# Altium PCB MiniPC.PcbDoc (part 2 of 24)
Units mm, origin at the board's own origin, x right, y up, seen from the top; angles counter-clockwise.
Board outline 175 x 155 mm, 16 copper layers (1_Top, 2_int1_(gnd), 3_int2_(power), 4_int3_(gnd), 5_int4_(sign), 6_int5_(power), 7_int6_(sign), 8_int7_(power), 9_int8_(gnd), 10_int9_(sign), 11_int10_(gnd), 12_int11_(sign), 13_int12_(gnd), 14_int13_(power), 15_int14_(gnd), 16_Bottom), stack 2.008 mm thick; 1046 components, 837 nets, 6010 pads, 4009 vias.
Unrouted connection lines stored in the file: 564.
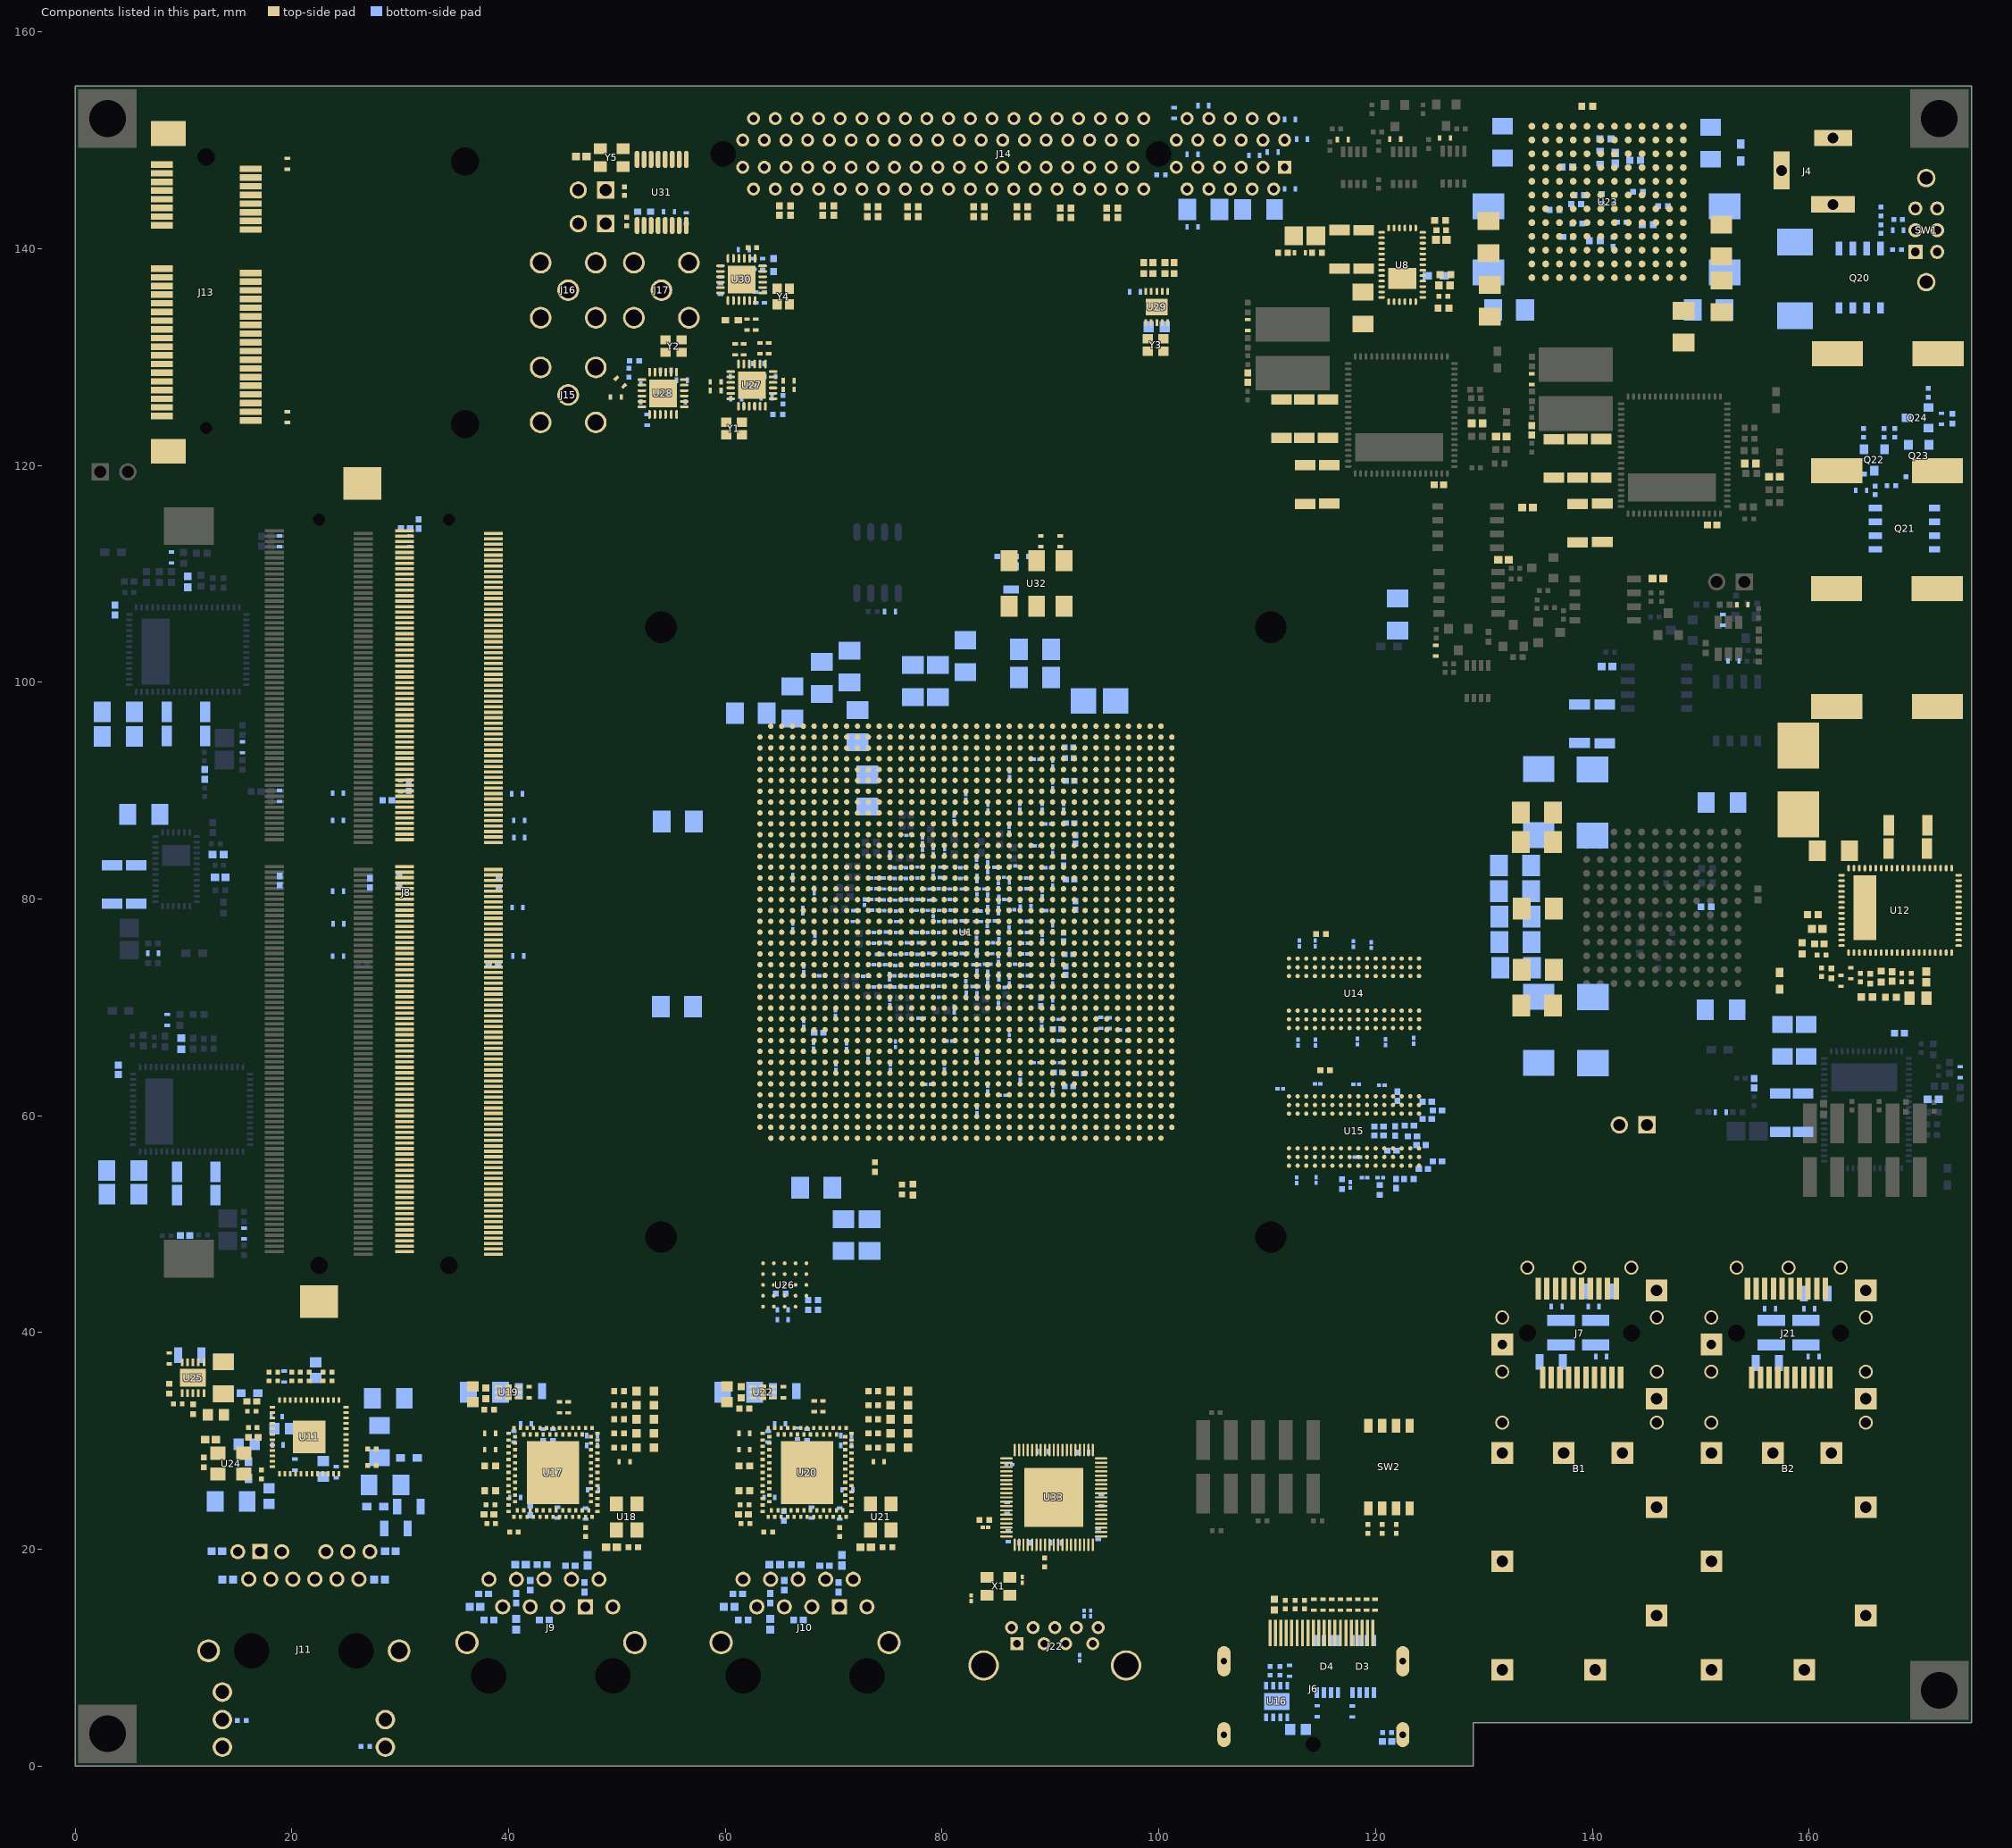
[diagram p16: the components of this part, seen from the top]

## Classes and differential pairs (continued)
component class 3V3_to_2V5: C60 C61 C62 C63 C64 C65 L7 R104 R105 R106 R107 R108 R109 R110 R111 U8
component class 12V_to_3V3: C95 C96 C97 C98 C99 C100 C101 C102 C103 C104 C105 C106 C107 L9 R155 R156 R157 R158 R159 R160 R161 R162 R163 R164 R165 R166 R167 R168 R169 R170 R171 U23
component class 12V_to_5V: C108 C109 C110 C111 C112 C113 C114 C115 C116 C117 F1 L10 R172 R173 R174 R175 R176 R177 R178 R179 R180 R181 R182 R183 U12
component class 12V_POWER: C73 C74 C75 C76 C77 C78 C79 D1 J4 J5 Q20 Q21 Q22 Q23 Q24 R128 R129 R130 R131 R132 R133 R134 R135 R136 R137 R138 R139 R140 SW1
component class U_PLL1: C510 C511 C512 C513 C514 C515 C516 C517 C518 C519 C520 C521 C522 C523 C524 C525 C526 C527 C528 C529 C530 C531 J15 J16 L17 L18 R333 R334 U27 U28 Y1 Y2
component class U_PLL: C532 C533 C534 C535 C536 C537 C538 C539 C540 C541 C542 C543 C544 C545 C546 C547 C548 C549 J17 J18 J19 L19 L20 L21 L22 R335 R336 R337 R338 R339 R340 R341 U29 U30 U31 U32 Y3 Y4 Y5
component class U_USB3: U1
component class U_USB3: C560 C561 C562 C563 C564 C565 C566 C567 C568 C569 C570 C571 C572 C573 C574 J22 R342 R343 U33 X1
component class U_DDR4: C264 C265 C266 C267 C268 C269 C270 C271 C272 C273 C274 C275 C276 C277 C278 C279 C280 C281 C282 R208 R209 R210 R211 R212 R213 R214 R215 R216 R217 R218 R219 R220 R221 R222 R223 R224 R225 R226 U14 U15
component class U_DDR4_SODIMM1: C283 C284 C285 C286 C287 C288 C289 J8 R227 R228 R229 R230 R231
component class U_DDR4_SODIMM_Arria10: R237 R238 R239 R240 R241
component class U_Ethernet-HPS: C362 C363 C364 C365 C366 C367 C368 C369 C370 C371 C372 C373 C374 C375 C376 C377 C378 C379 C380 C381 C382 C383 C384 C385 C386 C387 J11 L11 L12 L13 L14 R297 R298 R299 R300 R301 R302 R303 R304 R305 R306 R307 R308 R309 R310 R311 R312 R313 R314 R315 R316 U11 U24 U25
component class U_HPS1_Arria10: C388 C389 R317 R318 R319 R320 R321 R322 R323 R324 R325 SW2 U26
component class U_Display_Port: C297 C298 C299 C300 C301 C302 C303 C304 C305 C306 C307 C308 C309 D3 D4 J6 R242 R243 R244 R245 R246 R247 R248 U16
component class U_SFP_PortB: B2 C555 C556 C557 C558 C559 J21 L25 L26
component class U_SFP_PortA: B1 C550 C551 C552 C553 C554 J7 L23 L24
component class U_Ethernet2: C336 C337 C338 C339 C340 C341 C342 C343 C344 C345 C346 C347 C348 C349 C350 C351 C352 C353 C354 C355 C356 C357 C358 C359 C360 C361 D10 D11 D12 D13 D14 J10 R273 R274 R275 R276 R277 R278 R279 R280 R281 R282 R283 R284 R285 R286 R287 R288 R289 R290 R291 R292 R293 R294 R295 R296 U20 U21 U22
component class U_Ethernet1: C310 C311 C312 C313 C314 C315 C316 C317 C318 C319 C320 C321 C322 C323 C324 C325 C326 C327 C328 C329 C330 C331 C332 C333 C334 C335 D5 D6 D7 D8 D9 J9 R249 R250 R251 R252 R253 R254 R255 R256 R257 R258 R259 R260 R261 R262 R263 R264 R265 R266 R267 R268 R269 R270 R271 R272 U17 U18 U19
component class U_PCIE_Connector: C483 C484 C485 C486 C487 C488 C489 C490 C491 C492 C493 C494 C495 C496 C497 C498 C499 C500 C501 C502 C503 C504 C505 C506 C507 C508 C509 J14 R332
component class U_miniPCIE_Connector: C481 C482 J13
differential pair class DDR4_80: DDR4_CLK DDR4_DQS0 DDR4_DQS1 DDR4_DQS2 DDR4_DQS3 DDR4_SODIMM_CK0 DDR4_SODIMM_CK1 DDR4_SODIMM_CK2 DDR4_SODIMM_CK3 DDR4_SODIMM_DQS0 DDR4_SODIMM_DQS1 DDR4_SODIMM_DQS2 DDR4_SODIMM_DQS3 DDR4_SODIMM_DQS4 DDR4_SODIMM_DQS5 DDR4_SODIMM_DQS6 DDR4_SODIMM_DQS7
net class USB3: USB3_BE0 USB3_BE1 USB3_BE2 USB3_BE3 USB3_CLK USB3_D0 USB3_D1 USB3_D2 USB3_D3 USB3_D4 USB3_D5 USB3_D6 USB3_D7 USB3_D8 USB3_D9 USB3_D10 USB3_D11 USB3_D12 USB3_D13 USB3_D14 USB3_D15 USB3_D16 USB3_D17 USB3_D18 USB3_D19 USB3_D20 USB3_D21 USB3_D22 USB3_D23 USB3_D24 USB3_D25 USB3_D26 USB3_D27 USB3_D28 USB3_D29 USB3_D30 USB3_D31 USB3_OE USB3_RD USB3_RESERVED USB3_RXF USB3_SIWU USB3_TXE USB3_WAKEUP USB3_WR
net class PCIE_TX: PCIE_TX0_N PCIE_TX0_P PCIE_TX1_N PCIE_TX1_P PCIE_TX2_N PCIE_TX2_P PCIE_TX3_N PCIE_TX3_P PCIE_TX4_N PCIE_TX4_P PCIE_TX5_N PCIE_TX5_P PCIE_TX6_N PCIE_TX6_P PCIE_TX7_N PCIE_TX7_P
net class PCIE_TX_C: PCIE_TX0_C_N PCIE_TX0_C_P PCIE_TX1_C_N PCIE_TX1_C_P PCIE_TX2_C_N PCIE_TX2_C_P PCIE_TX3_C_N PCIE_TX3_C_P PCIE_TX4_C_N PCIE_TX4_C_P PCIE_TX5_C_N PCIE_TX5_C_P PCIE_TX6_C_N PCIE_TX6_C_P PCIE_TX7_C_N PCIE_TX7_C_P
net class PCIE_RX: PCIE_RX0_N PCIE_RX0_P PCIE_RX1_N PCIE_RX1_P PCIE_RX2_N PCIE_RX2_P PCIE_RX3_N PCIE_RX3_P PCIE_RX4_N PCIE_RX4_P PCIE_RX5_N PCIE_RX5_P PCIE_RX6_N PCIE_RX6_P PCIE_RX7_N PCIE_RX7_P
differential pair class SFPA_TX: SFPA_TX
differential pair class SFPA_RX: SFPA_RX
differential pair class SFPB_RX: SFPB_RX
differential pair class SFPB_TX: SFPB_TX
differential pair class PCIE_85: CLK_DIFF1 CLK_DIFF2 MINI_PCIE_PER MINI_PCIE_USB_D MINIPCIE_PET MINIPCIE_REFCLK PCIE_REFCLK_QR0 PCIE_REFCLK_SYN PCIE_RX0 PCIE_RX1 PCIE_RX2 PCIE_RX3 PCIE_RX4 PCIE_RX5 PCIE_RX6 PCIE_RX7 PCIE_TX0 PCIE_TX0_C PCIE_TX1 PCIE_TX1_C PCIE_TX2 PCIE_TX2_C PCIE_TX3 PCIE_TX3_C PCIE_TX4 PCIE_TX4_C PCIE_TX5 PCIE_TX5_C PCIE_TX6 PCIE_TX6_C PCIE_TX7 PCIE_TX7_C
net class PCIE_Upr: MINI_PCIE_SMB_CLK MINI_PCIE_SMB_DATA MINIPCIE_CLKREQ_L MINIPCIE_LED_WLAN_L MINIPCIE_PERST_L MINIPCIE_W_DISABLE_L MINIPCIE_WAKE_L PCIE_PERSTN
net class USB3_diff: USB3_D_N USB3_D_P USB3_SSRX_N USB3_SSRX_P USB3_TOD_N USB3_TOD_P
pad class Class_Polygon: C9-1 C10-1 C11-1 C12-1 C18-1 C19-1 C20-1 C21-1 C22-1 C28-1 C29-1 C30-1 C31-1 C37-1 C38-1 C39-1 C40-1 C45-1 C46-1 C47-1 C51-1 C52-1 C53-1 C55-1 C56-1 C61-1 C62-1 C63-1 C71-1 C72-1 C74-2 C75-2 C76-2 C77-2 C80-2 C81-1 C81-2 C82-1 C83-1 C84-1 C85-1 C85-2 C86-1 C87-2 C88-1 C88-2 C89-1 C90-1 C91-1 C92-1 C93-1 C95-2 C96-1 C97-1 C98-1 C99-1 C100-1 C101-2 C102-1 C103-1 C104-1 C105-1 C112-1 C113-1 C116-1 C132-1 C135-1 C206-2 C207-2 C208-2 C209-2 C222-2 C224-1 C225-1 C226-1 C227-1 C228-2 C231-1 C232-1 C236-1 C237-1 C238-1 C243-1 C244-1 C245-1 C246-1 C247-1 C256-1 C257-1 C258-2 C259-2 C260-1 C265-2 C266-2 C267-1 C282-1 C283-1 C284-1 C290-1 C291-1 C292-1 C293-1 C294-1 C309-1 C310-1 C311-1 C312-1 C327-1 C329-1 C495-2 D1-2 J4-1 J4-2 J4-3 L3-1 L5-1 L6-1 L8-1 Q20-1 Q20-2 Q20-3 U11-49 U33-69
net class SFP: SFPA_RX_N SFPA_RX_P SFPA_TX_N SFPA_TX_P SFPB_RX_N SFPB_RX_P SFPB_TX_N SFPB_TX_P
net class PCIE_CLK: PCIE_REFCLK_QR0_N PCIE_REFCLK_QR0_P PCIE_REFCLK_SYN_N PCIE_REFCLK_SYN_P
differential pair MINI_PCIE_USB_D: +MINI_PCIE_USB_D_P -MINI_PCIE_USB_D_N
differential pair USB3_SSRX: +USB3_SSRX_P -USB3_SSRX_N
differential pair USB3_TOD: +USB3_TOD_P -USB3_TOD_N
differential pair USB3_SSTX: +USB3_SSTX_P -USB3_SSTX_N
differential pair USB3_D: +USB3_D_P -USB3_D_N
differential pair TRD4: +TRD4_P -TRD4_N
differential pair TRD3: +TRD3_P -TRD3_N
differential pair TRD2: +TRD2_P -TRD2_N
differential pair TRD1: +TRD1_P -TRD1_N
differential pair REFCLK_SMA: +REFCLK_SMA_P -REFCLK_SMA_N
differential pair REFCLK_SDI: +REFCLK_SDI_P -REFCLK_SDI_N
differential pair REFCLK_DP: +REFCLK_DP_P -REFCLK_DP_N
differential pair REFCLK1_FMCB: +REFCLK1_FMCB_P -REFCLK1_FMCB_N
differential pair PCIE_TX7: +PCIE_TX7_P -PCIE_TX7_N
differential pair PCIE_TX7_C: +PCIE_TX7_C_P -PCIE_TX7_C_N
differential pair PCIE_TX6: +PCIE_TX6_P -PCIE_TX6_N
differential pair PCIE_TX6_C: +PCIE_TX6_C_P -PCIE_TX6_C_N
differential pair PCIE_TX5: +PCIE_TX5_P -PCIE_TX5_N
differential pair PCIE_TX5_C: +PCIE_TX5_C_P -PCIE_TX5_C_N
differential pair PCIE_TX4: +PCIE_TX4_P -PCIE_TX4_N
differential pair PCIE_TX4_C: +PCIE_TX4_C_P -PCIE_TX4_C_N
differential pair PCIE_TX3: +PCIE_TX3_P -PCIE_TX3_N
differential pair PCIE_TX3_C: +PCIE_TX3_C_P -PCIE_TX3_C_N
differential pair PCIE_TX2: +PCIE_TX2_P -PCIE_TX2_N
differential pair PCIE_TX2_C: +PCIE_TX2_C_P -PCIE_TX2_C_N
differential pair PCIE_TX1: +PCIE_TX1_P -PCIE_TX1_N
differential pair PCIE_TX1_C: +PCIE_TX1_C_P -PCIE_TX1_C_N
differential pair PCIE_TX0: +PCIE_TX0_P -PCIE_TX0_N
differential pair PCIE_TX0_C: +PCIE_TX0_C_P -PCIE_TX0_C_N
differential pair PCIE_RX7: +PCIE_RX7_P -PCIE_RX7_N
differential pair PCIE_RX6: +PCIE_RX6_P -PCIE_RX6_N
differential pair PCIE_RX5: +PCIE_RX5_P -PCIE_RX5_N
differential pair PCIE_RX4: +PCIE_RX4_P -PCIE_RX4_N
differential pair PCIE_RX3: +PCIE_RX3_P -PCIE_RX3_N
differential pair PCIE_RX2: +PCIE_RX2_P -PCIE_RX2_N
differential pair PCIE_RX1: +PCIE_RX1_P -PCIE_RX1_N
differential pair PCIE_RX0: +PCIE_RX0_P -PCIE_RX0_N
differential pair PCIE_REFCLK_SYN: +PCIE_REFCLK_SYN_P -PCIE_REFCLK_SYN_N
differential pair PCIE_REFCLK_QR0: +PCIE_REFCLK_QR0_P -PCIE_REFCLK_QR0_N
differential pair ENETB_TX: +ENETB_TX_P -ENETB_TX_N
differential pair ENETB_TXC: +ENETB_TXC_P -ENETB_TXC_N
differential pair ENETB_RX: +ENETB_RX_P -ENETB_RX_N
differential pair ENETB_RXC: +ENETB_RXC_P -ENETB_RXC_N
differential pair ENETA_TX: +ENETA_TX_P -ENETA_TX_N
differential pair ENETA_TXC: +ENETA_TXC_P -ENETA_TXC_N
differential pair ENETA_RX: +ENETA_RX_P -ENETA_RX_N
differential pair ENETA_RXC: +ENETA_RXC_P -ENETA_RXC_N
differential pair DP_ML_LANE3: +DP_ML_LANE3_P -DP_ML_LANE3_N
differential pair DP_ML_LANE3_C: +DP_ML_LANE3_C_P -DP_ML_LANE3_C_N
differential pair DP_ML_LANE2: +DP_ML_LANE2_P -DP_ML_LANE2_N
differential pair DP_ML_LANE2_C: +DP_ML_LANE2_C_P -DP_ML_LANE2_C_N
differential pair DP_ML_LANE1: +DP_ML_LANE1_P -DP_ML_LANE1_N
differential pair DP_ML_LANE1_C: +DP_ML_LANE1_C_P -DP_ML_LANE1_C_N
differential pair DP_ML_LANE0: +DP_ML_LANE0_P -DP_ML_LANE0_N
differential pair DP_ML_LANE0_C: +DP_ML_LANE0_C_P -DP_ML_LANE0_C_N
differential pair DDR4_DQS3: +DDR4_DQS3_P -DDR4_DQS3_N
differential pair DDR4_DQS2: +DDR4_DQS2_P -DDR4_DQS2_N
differential pair DDR4_DQS1: +DDR4_DQS1_P -DDR4_DQS1_N
differential pair DDR4_DQS0: +DDR4_DQS0_P -DDR4_DQS0_N
differential pair DDR4_CLK: +DDR4_CLK_P -DDR4_CLK_N
differential pair CLK_ENET_FPGA: +CLK_ENET_FPGA_P -CLK_ENET_FPGA_N
differential pair BMDI3: +BMDI3_P -BMDI3_N
differential pair BMDI2: +BMDI2_P -BMDI2_N
differential pair BMDI1: +BMDI1_P -BMDI1_N
differential pair BMDI0: +BMDI0_P -BMDI0_N
differential pair AMDI3: +AMDI3_P -AMDI3_N
differential pair AMDI2: +AMDI2_P -AMDI2_N
differential pair AMDI1: +AMDI1_P -AMDI1_N
differential pair AMDI0: +AMDI0_P -AMDI0_N
differential pair REFCLK0_FMCB: +REFCLK0_FMCB_P -REFCLK0_FMCB_N
differential pair SFPA_RX: +SFPA_RX_P -SFPA_RX_N
differential pair SFPA_TX: +SFPA_TX_P -SFPA_TX_N
differential pair SFPB_RX: +SFPB_RX_P -SFPB_RX_N
differential pair SFPB_TX: +SFPB_TX_P -SFPB_TX_N
differential pair DDR4_SODIMM_CK0: +DDR4_SODIMM_CK0_P -DDR4_SODIMM_CK0_N
differential pair DDR4_SODIMM_CK1: +DDR4_SODIMM_CK1_P -DDR4_SODIMM_CK1_N
differential pair DDR4_SODIMM_DQS0: +DDR4_SODIMM_DQS0_P -DDR4_SODIMM_DQS0_N
differential pair DDR4_SODIMM_DQS1: +DDR4_SODIMM_DQS1_P -DDR4_SODIMM_DQS1_N
differential pair DDR4_SODIMM_DQS2: +DDR4_SODIMM_DQS2_P -DDR4_SODIMM_DQS2_N
differential pair DDR4_SODIMM_DQS3: +DDR4_SODIMM_DQS3_P -DDR4_SODIMM_DQS3_N
differential pair DDR4_SODIMM_DQS4: +DDR4_SODIMM_DQS4_P -DDR4_SODIMM_DQS4_N
differential pair DDR4_SODIMM_DQS5: +DDR4_SODIMM_DQS5_P -DDR4_SODIMM_DQS5_N
differential pair DDR4_SODIMM_DQS6: +DDR4_SODIMM_DQS6_P -DDR4_SODIMM_DQS6_N
differential pair DDR4_SODIMM_DQS7: +DDR4_SODIMM_DQS7_P -DDR4_SODIMM_DQS7_N
differential pair DDR4_SODIMM_CK2: +DDR4_SODIMM_CK2_P -DDR4_SODIMM_CK2_N
differential pair DDR4_SODIMM_CK3: +DDR4_SODIMM_CK3_P -DDR4_SODIMM_CK3_N
differential pair CLK_DIFF1: +CLK_DIFF1_P -CLK_DIFF1_N
differential pair CLK_DIFF2: +CLK_DIFF2_P -CLK_DIFF2_N
differential pair ENET_REFCLK_C: +ENET_REFCLK_C_P -ENET_REFCLK_C_N
differential pair REFCLK0_FMCB_C: +REFCLK0_FMCB_C_P -REFCLK0_FMCB_C_N
differential pair REFCLK1_FMCB_C: +REFCLK1_FMCB_C_P -REFCLK1_FMCB_C_N
differential pair REFCLK_DP_C: +REFCLK_DP_C_P -REFCLK_DP_C_N
differential pair MINI_PCIE_PER: +MINI_PCIE_PER_P -MINI_PCIE_PER_N
differential pair MINIPCIE_PET: +MINIPCIE_PET_P -MINIPCIE_PET_N
differential pair MINIPCIE_REFCLK: +MINIPCIE_REFCLK_P -MINIPCIE_REFCLK_N
differential pair A10_HLVDDI: +A10_HLVDDI_P -A10_HLVDDI_N

## Components (designator, comment, footprint, x,y, rotation, side; value= is the part's Value field where it differs from the comment)
B1 "74754-0101" MOLX-74754-0101_V 138.8,27.45 r180 top locked
B2 "74754-0101" MOLX-74754-0101_V 158.1,27.45 r180 top locked
C1 "CGB2A1X5R1E105K033BC" CAPC1005X33X10LL5 125.55,102.91 r90 top
C2 "GRM155R71H103KA88D" CAPC1005X55X25ML05T10 134.01,116.1 r180 top
C3 "GRM155R71H103KA88D" CAPC1005X55X25ML05T10 131.8,111.3 r180 top
C4 "CGB2A1X5R1E105K033BC" CAPC1005X33X10LL5 121.8,150.1 r0 top
C5 "CGB2A1X5R1E105K033BC" CAPC1005X33X10LL5 126.4,150.2 r0 top
C6 "CGB2A1X5R1E105K033BC" CAPC1005X33X10LL5 116.97,150.05 r0 top
C7 "CGB2A1X5R1E105K033BC" CAPC1005X33X10LL5 15.45,93.99 r90 bottom
C8 "C1005C0G1H220J050BA" CAPC1005X55X10LL05 8.9,111.5 r270 bottom locked
C9 "GRM31CR61E226KE15L" CAPC3216X180X55ML20T25 3.99,97.28 r180 bottom
C10 "GRM31CR61E226KE15L" CAPC3216X180X55ML20T25 3.99,94.99 r180 bottom
C11 "C3216X5R1A476M160AB" CAPC3216X180X20ML20 10.22,95.03 r0 bottom
C12 "C3216X5R1A476M160AB" CAPC3216X180X20ML20 10.25,97.28 r0 bottom
C13 "GRM155R61A224KE19D" CAPC1005X55X25NL05T10 11.95,91.49 r270 bottom
C14 "VJ0402Y153JXQPW1BC" CAPC1005X55X23ML05T8 10.4,109.26 r270 bottom locked
C15 "GRM155R61A224KE19D" CAPC1005X55X25NL05T10 3.7,106.66 r270 bottom locked
C16 "GRM155R61A224KE19D" CAPC1005X55X25NL05T10 108.19,128.11 r270 top
C17 "ECJ-0EC1H270J" CAPC1005X55X20ML5T10 131.59,122.67 r0 top
C18 "C3216X5R1A476M160AB" CAPC3216X180X20ML20 113.51,118.23 r270 top
C19 "C3216X5R1A476M160AB" CAPC3216X180X20ML20 115.73,118.25 r270 top
C20 "C3216X5R1A476M160AB" CAPC3216X180X20ML20 111.3,124.315 r90 top
C21 "C3216X5R1A476M160AB" CAPC3216X180X20ML20 115.61,124.31 r90 top
C22 "C3216X5R1A476M160AB" CAPC3216X180X20ML20 113.43,124.32 r90 top
C23 "CGB2A1X5R1E105K033BC" CAPC1005X33X10LL5 108.21,132.95 r90 top
C24 "VJ0402Y153JXQPW1BC" CAPC1005X55X23ML05T8 129.365,123.87 r180 top
C25 "GRM155R61A224KE19D" CAPC1005X55X25NL05T10 125.84,118.21 r180 top
C26 "CGB2A1X5R1E105K033BC" CAPC1005X33X10LL5 15.6,49.15 r90 bottom
C27 "C1005C0G1H220J050BA" CAPC1005X55X10LL05 8.495,68.85 r270 bottom locked
C28 "GRM31CR61E226KE15L" CAPC3216X180X55ML20T25 4.41,54.97 r180 bottom
C29 "GRM31CR61E226KE15L" CAPC3216X180X55ML20T25 4.42,52.77 r180 bottom
C30 "C3216X5R1A476M160AB" CAPC3216X180X20ML20 11.185,54.83 r0 bottom
C31 "C3216X5R1A476M160AB" CAPC3216X180X20ML20 11.17,52.69 r0 bottom
C32 "GRM155R61A224KE19D" CAPC1005X55X25NL05T10 10.15,48.95 r180 bottom
C33 "VJ0402Y153JXQPW1BC" CAPC1005X55X23ML05T8 9.795,66.65 r270 bottom locked
C34 "GRM155R61A224KE19D" CAPC1005X55X25NL05T10 3.995,64.25 r270 bottom locked
C35 "CGB2A1X5R1E105K033BC" CAPC1005X33X10LL5 151.83,60.34 r0 bottom
C36 "C1005C0G1H220J050BA" CAPC1005X55X10LL05 173.935,64.03 r90 bottom locked
C37 "GRM31CR61E226KE15L" CAPC3216X180X55ML20T25 157.52,66.95 r90 bottom
C38 "GRM31CR61E226KE15L" CAPC3216X180X55ML20T25 159.71,66.96 r90 bottom
C39 "C3216X5R1A476M160AB" CAPC3216X180X20ML20 157.32,60.28 r270 bottom
C40 "C3216X5R1A476M160AB" CAPC3216X180X20ML20 159.44,60.29 r270 bottom
C41 "GRM155R61A224KE19D" CAPC1005X55X25NL05T10 154.91,63 r90 bottom
C42 "VJ0402Y153JXQPW1BC" CAPC1005X55X23ML05T8 171.435,61.53 r180 bottom locked
C43 "GRM155R61A224KE19D" CAPC1005X55X25NL05T10 168.335,67.63 r180 bottom locked
C44 "CGB2A1X5R1E105K033BC" CAPC1005X33X10LL5 7.2,75 r0 bottom locked
C45 "GRM31CR61E226KE15L" CAPC3216X180X55ML20T25 6.34,87.81 r0 bottom
C46 "C3216X5R1A476M160AB" CAPC3216X180X20ML20 3.43,81.355 r270 bottom
C47 "C3216X5R1A476M160AB" CAPC3216X180X20ML20 5.64,81.335 r270 bottom
C48 "ECJ-0EC1H150J" CAPC1005X55X20ML5T10 13.4,82 r0 bottom locked
C49 "VJ0402Y153JXQPW1BC" CAPC1005X55X23ML05T8 13.2,84.1 r180 bottom locked
C50 "GRM155R61A224KE19D" CAPC1005X55X25NL05T10 134.41,123.25 r270 top
C51 "ECJ-0EC1H270J" CAPC1005X55X20ML5T10 156.795,118.96 r0 top
C52 "C3216X5R1A476M160AB" CAPC3216X180X20ML20 140.91,114.7 r270 top
C53 "C3216X5R1A476M160AB" CAPC3216X180X20ML20 138.64,114.67 r270 top
C54 "C3216X5R1A476M160AB" CAPC3216X180X20ML20 138.62,120.66 r90 top
C55 "C3216X5R1A476M160AB" CAPC3216X180X20ML20 140.82,120.66 r90 top
C56 "C3216X5R1A476M160AB" CAPC3216X180X20ML20 136.43,120.63 r90 top
C57 "CGB2A1X5R1E105K033BC" CAPC1005X33X10LL5 134.41,127.96 r90 top
C58 "VJ0402Y153JXQPW1BC" CAPC1005X55X23ML05T8 154.57,120.16 r180 top
C59 "GRM155R61A224KE19D" CAPC1005X55X25NL05T10 151.045,114.5 r180 top
C60 "CGB2A1X5R1E105K033BC" CAPC1005X33X10LL5 113.02,139.62 r180 top
C61 "GRM31CR61E226KE15L" CAPC3216X180X55ML20T25 118.83,134.52 r270 top
C62 "C3216X5R1A476M160AB" CAPC3216X180X20ML20 118.88,139.93 r90 top
C63 "C3216X5R1A476M160AB" CAPC3216X180X20ML20 116.67,139.94 r90 top
C64 "ECJ-0EC1H150J" CAPC1005X55X20ML5T10 126.05,140.8 r0 top
C65 "VJ0402Y153JXQPW1BC" CAPC1005X55X23ML05T8 126.35,136.6 r180 top
C66 "CGB2A1X5R1E105K033BC" CAPC1005X33X10LL5 153.02,101.96 r180 bottom
C67 "GRM155R71H103KA88D" CAPC1005X55X25ML05T10 146.045,109.55 r180 top
C68 "C1005X7R1E104M" CAPC1005X55X10LL05 152.045,105.75 r90 bottom locked
C69 "C1005X7R1E104M" CAPC1005X55X10LL05 153.845,107.15 r180 top
C70 "GRM155R71H103KA88D" CAPC1005X55X25ML05T10 141.345,101.45 r0 bottom locked
C71 "C3216X5R1A476M160AB" CAPC3216X180X20ML20 141.145,96.15 r90 bottom locked
C72 "C3216X5R1A476M160AB" CAPC3216X180X20ML20 138.81,96.16 r90 bottom
C73 "CGB2A1X5R1E105K033BC" CAPC1005X33X10LL5 168.2,141.7 r180 bottom locked
C74 "EEH-ZA1E331P" PNSC-EEH-ZA1E331P_M 167.19,119.5 r0 top
C75 "EEH-ZA1E331P" PNSC-EEH-ZA1E331P_M 167.19,97.76 r0 top
C76 "EEH-ZA1E331P" PNSC-EEH-ZA1E331P_M 167.16,108.62 r0 top
C77 "EEH-ZA1E331P" PNSC-EEH-ZA1E331P_M 167.24,130.31 r0 top
C78 "CGB2A1X5R1E105K033BC" CAPC1005X33X10LL5 164.8,117.7 r180 bottom locked
C79 "C1005X7R1E104M" CAPC1005X55X10LL05 172.2,124.3 r90 bottom locked
C80 "6TPF330M9L" PNSC-TPF-D3L_V 135.04,88.94 r90 bottom
C81 "6TPF330M9L" PNSC-TPF-D3L_V 140.05,67.91 r270 bottom
C82 "GRM31CR60J107ME39L" CAPC3216X190X55ML30T25 134.88,87.97 r0 top
C83 "GRM31CR60J107ME39L" CAPC3216X190X55ML30T25 134.87,85.26 r0 top
C84 "GRM31CR60J107ME39L" CAPC3216X190X55ML30T25 132.89,78.37 r0 bottom
C85 "GRM31CR61E226KE15L" CAPC3216X180X55ML20T25 151.965,88.895 r0 bottom
C86 "GRM31CR61E226KE15L" CAPC3216X180X55ML20T25 151.88,69.77 r0 bottom
C87 "6TPF330M9L" PNSC-TPF-D3L_V 140,88.89 r90 bottom
C88 "6TPF330M9L" PNSC-TPF-D3L_V 135.03,67.94 r270 bottom
C89 "GRM31CR60J107ME39L" CAPC3216X190X55ML30T25 134.9,70.17 r0 top
C90 "GRM31CR60J107ME39L" CAPC3216X190X55ML30T25 134.95,73.47 r0 top
C91 "GRM31CR60J107ME39L" CAPC3216X190X55ML30T25 132.9,76.03 r0 bottom
C92 "GRM31CR60J107ME39L" CAPC3216X190X55ML30T25 132.96,73.66 r0 bottom
C93 "GRM31CR60J107ME39L" CAPC3216X190X55ML30T25 134.96,79.11 r0 top
C94 "VJ0402Y182JXJCW1BC" CAPC1005X55X23NL05T8 150.49,79.295 r180 bottom locked
C95 "6TPF330M9L" PNSC-TPF-D3L_V 130.4,140.85 r90 bottom locked
C96 "GRM31CR60J107ME39L" CAPC3216X190X55ML30T25 132.31,134.34 r0 bottom
C97 "GRM31CR60J107ME39L" CAPC3216X190X55ML30T25 130.41,141.05 r270 top
C98 "GRM31CR60J107ME39L" CAPC3216X190X55ML30T25 130.54,135.19 r90 top
C99 "GRM31CR61E226KE15L" CAPC3216X180X55ML20T25 150.9,149.725 r90 bottom locked
C100 "GRM31CR61E226KE15L" CAPC3216X180X55ML20T25 131.7,149.825 r90 bottom locked
C101 "6TPF330M9L" PNSC-TPF-D3L_V 152.2,140.85 r90 bottom locked
C102 "GRM31CR60J107ME39L" CAPC3216X190X55ML30T25 151.9,135.6 r90 top
C103 "GRM31CR60J107ME39L" CAPC3216X190X55ML30T25 150.71,134.34 r180 bottom
C104 "GRM31CR60J107ME39L" CAPC3216X190X55ML30T25 151.89,140.74 r270 top
C105 "GRM31CR60J107ME39L" CAPC3216X190X55ML30T25 148.42,132.79 r90 top
C106 "ECJ-0EC1H680J" CAPC1005X55X20ML5T10 142.1,148.335 r270 bottom locked
C107 "CGJ2B2X7R1E222K050BA" CAPC1005X55X10ML05 140.7,148.425 r270 bottom locked
C108 "GRM1535C1H560JDD5D" CAPC1005X33X20ML05T10 165.334,70.95 r0 top
C109 "CGB2A1X5R1E105K033BC" CAPC1005X33X10LL5 162.934,72.45 r90 top
C110 "GRM155R71E473KA88D" CAPC1005X55X25NL05T10 167.634,72.85 r90 top
C111 "GRM155R71E223KA61D" CAPC1005X55X25ML05T10 160.734,77.25 r180 top
C112 "C3216X5R1A476M160AB" CAPC3216X180X20ML20 169.075,84.66 r0 top
C113 "C3216X5R1A476M160AB" CAPC3216X180X20ML20 169.115,86.81 r0 top
C114 "CGB2A1X5R1E105K033BC" CAPC1005X33X10LL5 163.834,73.15 r270 top
C115 "GRM155R61A224KE19D" CAPC1005X55X25NL05T10 160.934,75.85 r180 top
C116 "GRM31CR61E226KE15L" CAPC3216X180X55ML20T25 162.23,84.46 r180 top
C117 "GRM155R71H681KA01D" CAPC1005X55X25ML05T10 170.805,72.81 r90 top
C118 "GRM033R60J104KE19D" CAPC0603X33X15LL03T05 81.125,69.8 r90 bottom locked
C119 "GRM033R60J104KE19D" CAPC0603X33X15LL03T05 85.5,71.85 r180 bottom locked
C120 "GRM033R60J104KE19D" CAPC0603X33X15LL03T05 85.2,70.675 r90 bottom locked
C121 "GRM033R60J104KE19D" CAPC0603X33X15LL03T05 86.5,83.05 r180 bottom locked
C122 "GRM033R60J104KE19D" CAPC0603X33X15LL03T05 84.2,83.65 r270 bottom locked
C123 "GRM033R60J104KE19D" CAPC0603X33X15LL03T05 78.075,69 r180 bottom locked
C124 "GRM033R60J104KE19D" CAPC0603X33X15LL03T05 75.175,70.45 r90 bottom locked
C125 "GRM033R60J104KE19D" CAPC0603X33X15LL03T05 72.975,72.875 r180 bottom locked
C126 "GRM033R60J104KE19D" CAPC0603X33X15LL03T05 72,77.925 r0 bottom locked
C127 "GRM033R60J104KE19D" CAPC0603X33X15LL03T05 72.05,78.925 r0 bottom locked
C128 "GRM033R60J104KE19D" CAPC0603X33X15LL03T05 72.825,79.7 r90 bottom locked
C129 "GRM033R60J104KE19D" CAPC0603X33X15LL03T05 75.175,84.05 r270 bottom locked
C130 "GRM033R60J104KE19D" CAPC0603X33X15LL03T05 76.975,85.875 r180 bottom locked
C131 "C1005X7R1E104M" CAPC1005X55X10LL05 75.2,106.5 r180 bottom locked
C132 "GRM31CR60J107ME39L" CAPC3216X190X55ML30T25 132.86,80.73 r0 bottom
C133 "GRM31CR60J107ME39L" CAPC3216X190X55ML30T25 82.15,102.4 r270 bottom locked
C134 "GRM31CR60J107ME39L" CAPC3216X190X55ML30T25 88.575,103.025 r180 bottom locked
C135 "GRM31CR60J107ME39L" CAPC3216X190X55ML30T25 132.86,83.09 r0 bottom
C136 "GRM31CR60J107ME39L" CAPC3216X190X55ML30T25 70.9,49 r90 bottom locked
C137 "GRM31CR60J107ME39L" CAPC3216X190X55ML30T25 73.3,49 r90 bottom locked
C138 "GRM31CR60J107ME39L" CAPC3216X190X55ML30T25 62.35,97.13 r0 bottom
C139 "GRM31CR60J107ME39L" CAPC3216X190X55ML30T25 88.57,100.44 r180 bottom
C140 "GRM31CR60J107ME39L" CAPC3216X190X55ML30T25 66.175,98.125 r270 bottom locked
C141 "GRM31CR60J107ME39L" CAPC3216X190X55ML30T25 73.1,90 r270 bottom locked
C142 "GRM31CR60J107ME39L" CAPC3216X190X55ML30T25 55.625,87.15 r0 bottom locked
C143 "GRM033R60J104KE19D" CAPC0603X33X15LL03T05 79.175,84.425 r270 bottom locked
C144 "GRM033R60J104KE19D" CAPC0603X33X15LL03T05 77.975,82.95 r180 bottom locked
C145 "GRM033R60J104KE19D" CAPC0603X33X15LL03T05 80.1,82.95 r180 bottom locked
C146 "GRM033R60J104KE19D" CAPC0603X33X15LL03T05 80.05,81.975 r180 bottom locked
C147 "GRM31CR60J107ME39L" CAPC3216X190X55ML30T25 72.194,95.939 r270 bottom locked
C148 "GRM31CR60J107ME39L" CAPC3216X190X55ML30T25 68.9,100.4 r270 bottom locked
C149 "GRM31CR60J107ME39L" CAPC3216X190X55ML30T25 79.6,100.1 r270 bottom locked
C150 "GRM31CR60J107ME39L" CAPC3216X190X55ML30T25 77.3,100.1 r270 bottom locked
C151 "GRM31CR60J107ME39L" CAPC3216X190X55ML30T25 68.375,53.375 r0 bottom locked
C152 "GRM31CR60J107ME39L" CAPC3216X190X55ML30T25 71.46,101.45 r270 bottom
C153 "GRM033R60J104KE19D" CAPC0603X33X15LL03T05 73.45,73.95 r0 bottom locked
C154 "GRM033R60J104KE19D" CAPC0603X33X15LL03T05 84.2,73.975 r0 bottom locked
C155 "GRM033R60J104KE19D" CAPC0603X33X15LL03T05 83.075,71.925 r0 bottom locked
C156 "GRM033R60J104KE19D" CAPC0603X33X15LL03T05 85.225,72.85 r90 bottom locked
C157 "GRM033R60J104KE19D" CAPC0603X33X15LL03T05 84.2,72.025 r270 bottom locked
C158 "GRM033R60J104KE19D" CAPC0603X33X15LL03T05 83.2,73.1 r270 bottom locked
C159 "GRM033R60J104KE19D" CAPC0603X33X15LL03T05 79.975,73.975 r180 bottom locked
C160 "GRM033R60J104KE19D" CAPC0603X33X15LL03T05 82.025,75.925 r180 bottom locked
C161 "GRM31CR60J107ME39L" CAPC3216X190X55ML30T25 55.525,70.075 r0 bottom locked
C162 "GRM033R60J104KE19D" CAPC0603X33X15LL03T05 84.175,77.25 r270 bottom locked
C163 "GRM033R60J104KE19D" CAPC0603X33X15LL03T05 79.95,76.925 r180 bottom locked
C164 "GRM033R60J104KE19D" CAPC0603X33X15LL03T05 73.425,76.925 r0 bottom locked
C165 "GRM033R60J104KE19D" CAPC0603X33X15LL03T05 85.225,76.575 r90 bottom locked
C166 "GRM033R60J104KE19D" CAPC0603X33X15LL03T05 83.175,76.675 r90 bottom locked
C167 "GRM033R60J104KE19D" CAPC0603X33X15LL03T05 74.525,76.95 r0 bottom locked
C168 "GRM033R60J104KE19D" CAPC0603X33X15LL03T05 87.55,77.95 r180 bottom locked
C169 "GRM033R60J104KE19D" CAPC0603X33X15LL03T05 87.525,80.95 r180 bottom locked
C170 "GRM033R60J104KE19D" CAPC0603X33X15LL03T05 85.075,82.925 r180 bottom locked
C171 "GRM033R60J104KE19D" CAPC0603X33X15LL03T05 80.975,79.975 r180 bottom locked
C172 "GRM033R60J104KE19D" CAPC0603X33X15LL03T05 85.45,82 r180 bottom locked
C173 "GRM033R60J104KE19D" CAPC0603X33X15LL03T05 80.975,80.925 r180 bottom locked
C174 "GRM033R60J104KE19D" CAPC0603X33X15LL03T05 85.225,79.95 r270 bottom locked
C175 "GRM033R60J104KE19D" CAPC0603X33X15LL03T05 84.2,82.2 r90 bottom locked
C176 "GRM033R60J104KE19D" CAPC0603X33X15LL03T05 81.025,78.975 r180 bottom locked
C177 "GRM033R60J104KE19D" CAPC0603X33X15LL03T05 83.325,77.925 r180 bottom locked
C178 "GRM033R60J104KE19D" CAPC0603X33X15LL03T05 86.4,79 r180 bottom locked
C179 "GRM033R60J104KE19D" CAPC0603X33X15LL03T05 83.275,78.9 r180 bottom locked
C180 "GRM033R60J104KE19D" CAPC0603X33X15LL03T05 87.2,79.575 r90 bottom locked
C181 "GRM033R60J104KE19D" CAPC0603X33X15LL03T05 85.2,78.925 r90 bottom locked
C182 "GRM033R60J104KE19D" CAPC0603X33X15LL03T05 86.175,77.65 r90 bottom locked
C183 "GRM033R60J104KE19D" CAPC0603X33X15LL03T05 84.2,79.025 r90 bottom locked
C184 "GRM033R60J104KE19D" CAPC0603X33X15LL03T05 83.2,81.9 r90 bottom locked
C185 "GRM033R60J104KE19D" CAPC0603X33X15LL03T05 84.6,77.975 r0 bottom locked
C186 "GRM033R60J104KE19D" CAPC0603X33X15LL03T05 88.2,79.625 r90 bottom locked
C187 "GRM033R60J104KE19D" CAPC0603X33X15LL03T05 83.65,80.925 r0 bottom locked
C188 "GRM033R60J104KE19D" CAPC0603X33X15LL03T05 81.95,81.9 r180 bottom locked
C189 "GRM033R60J104KE19D" CAPC0603X33X15LL03T05 87.475,81.95 r180 bottom locked
C190 "GRM033R60J104KE19D" CAPC0603X33X15LL03T05 81.95,82.9 r180 bottom locked
C191 "GRM033R60J104KE19D" CAPC0603X33X15LL03T05 78.95,78.95 r180 bottom locked
C192 "GRM033R60J104KE19D" CAPC0603X33X15LL03T05 86.2,81.25 r270 bottom locked
C193 "GRM033R60J104KE19D" CAPC0603X33X15LL03T05 83.175,83.35 r270 bottom locked
C194 "GRM033R60J104KE19D" CAPC0603X33X15LL03T05 79.975,78.95 r180 bottom locked
C195 "GRM033R60J104KE19D" CAPC0603X33X15LL03T05 83.225,71.075 r90 bottom locked
C196 "GRM033R60J104KE19D" CAPC0603X33X15LL03T05 78.1,75.95 r180 bottom locked
C197 "GRM033R60J104KE19D" CAPC0603X33X15LL03T05 75.15,72.825 r90 bottom locked
C198 "GRM033R60J104KE19D" CAPC0603X33X15LL03T05 73.425,71.875 r0 bottom locked
C199 "GRM033R60J104KE19D" CAPC0603X33X15LL03T05 75.85,71.875 r180 bottom locked
C200 "GRM033R60J104KE19D" CAPC0603X33X15LL03T05 82.225,71.1 r90 bottom locked
C201 "GRM033R60J104KE19D" CAPC0603X33X15LL03T05 86,79.975 r0 bottom locked
C202 "GRM033R60J104KE19D" CAPC0603X33X15LL03T05 85.2,81.2 r90 bottom locked
C203 "GRM033R60J104KE19D" CAPC0603X33X15LL03T05 82.05,77.975 r180 bottom locked
C204 "GRM033R60J104KE19D" CAPC0603X33X15LL03T05 79.175,82.425 r270 bottom locked
C205 "GRM033R60J104KE19D" CAPC0603X33X15LL03T05 77.925,78.95 r180 bottom locked
C206 "GRM033R60J104KE19D" CAPC0603X33X15LL03T05 75.95,80.9 r180 bottom locked
C207 "GRM033R60J104KE19D" CAPC0603X33X15LL03T05 76.925,81.9 r180 bottom locked
C208 "GRM033R60J104KE19D" CAPC0603X33X15LL03T05 77,75.95 r180 bottom locked
C209 "GRM033R60J104KE19D" CAPC0603X33X15LL03T05 78.925,76.925 r180 bottom locked
C210 "GRM033R60J104KE19D" CAPC0603X33X15LL03T05 76.975,74.925 r180 bottom locked
C211 "GRM033R60J104KE19D" CAPC0603X33X15LL03T05 75.875,72.9 r180 bottom locked
C212 "GRM033R60J104KE19D" CAPC0603X33X15LL03T05 76.9,72.925 r180 bottom locked
C213 "GRM033R60J104KE19D" CAPC0603X33X15LL03T05 78.95,72.95 r180 bottom locked
C214 "GRM033R60J104KE19D" CAPC0603X33X15LL03T05 81.025,74.95 r180 bottom locked
C215 "GRM033R60J104KE19D" CAPC0603X33X15LL03T05 87.65,75.925 r180 bottom locked
C216 "GRM033R60J104KE19D" CAPC0603X33X15LL03T05 86.225,75.125 r90 bottom locked
C217 "GRM033R60J104KE19D" CAPC0603X33X15LL03T05 87.55,76.925 r180 bottom locked
C218 "GRM033R60J104KE19D" CAPC0603X33X15LL03T05 74.925,78.925 r180 bottom locked
C219 "GRM033R60J104KE19D" CAPC0603X33X15LL03T05 74.525,75.95 r0 bottom locked
C220 "GRM033R60J104KE19D" CAPC0603X33X15LL03T05 73.7,81.925 r0 bottom locked
C221 "GRM033R60J104KE19D" CAPC0603X33X15LL03T05 74.875,81.925 r180 bottom locked
C222 "GRM033R60J104KE19D" CAPC0603X33X15LL03T05 79.075,75 r180 bottom locked
C223 "GRM033R60J104KE19D" CAPC0603X33X15LL03T05 87.65,71.95 r180 bottom locked
C224 "GRM033R60J104KE19D" CAPC0603X33X15LL03T05 82.025,76.975 r180 bottom locked
C225 "GRM033R60J104KE19D" CAPC0603X33X15LL03T05 76.875,71.9 r180 bottom locked
C226 "GRM033R60J104KE19D" CAPC0603X33X15LL03T05 77.925,72.925 r180 bottom locked
C227 "GRM033R60J104KE19D" CAPC0603X33X15LL03T05 83.2,75.025 r90 bottom locked
C228 "GRM033R60J104KE19D" CAPC0603X33X15LL03T05 87.625,74.925 r180 bottom locked
C229 "GRM033R60J104KE19D" CAPC0603X33X15LL03T05 87.65,73.95 r0 bottom locked
C230 "GRM033R60J104KE19D" CAPC0603X33X15LL03T05 84.375,74.95 r180 bottom locked
C231 "GRM033R60J104KE19D" CAPC0603X33X15LL03T05 73.675,80.95 r0 bottom locked
C232 "GRM033R60J104KE19D" CAPC0603X33X15LL03T05 78.6,80.925 r0 bottom locked
C233 "GRM033R60J104KE19D" CAPC0603X33X15LL03T05 79.925,80.95 r180 bottom locked
C234 "GRM033R60J104KE19D" CAPC0603X33X15LL03T05 73.8,78.975 r0 bottom locked
C235 "GRM033R60J104KE19D" CAPC0603X33X15LL03T05 75.9,82.9 r180 bottom locked
C236 "GRM033R60J104KE19D" CAPC0603X33X15LL03T05 77.9,76.925 r180 bottom locked
C237 "GRM033R60J104KE19D" CAPC0603X33X15LL03T05 74.475,73.95 r0 bottom locked
C238 "GRM033R60J104KE19D" CAPC0603X33X15LL03T05 74.525,71.925 r0 bottom locked
C239 "GRM033R60J104KE19D" CAPC0603X33X15LL03T05 78,74.9 r180 bottom locked
C240 "GRM033R60J104KE19D" CAPC0603X33X15LL03T05 73.45,75.925 r0 bottom locked
C241 "GRM033R60J104KE19D" CAPC0603X33X15LL03T05 74.9,80.925 r180 bottom locked
C242 "GRM033R60J104KE19D" CAPC0603X33X15LL03T05 77.975,81.925 r180 bottom locked
C243 "GRM033R60J104KE19D" CAPC0603X33X15LL03T05 75.9,81.9 r180 bottom locked
C244 "GRM033R60J104KE19D" CAPC0603X33X15LL03T05 73.725,79.95 r0 bottom locked
C245 "GRM033R60J104KE19D" CAPC0603X33X15LL03T05 74.875,79.925 r180 bottom locked
C246 "GRM033R60J104KE19D" CAPC0603X33X15LL03T05 75.95,79.9 r180 bottom locked
C247 "GRM033R60J104KE19D" CAPC0603X33X15LL03T05 76,78.9 r180 bottom locked
C248 "GRM033R60J104KE19D" CAPC0603X33X15LL03T05 75.5,77.925 r0 bottom locked
C249 "GRM033R60J104KE19D" CAPC0603X33X15LL03T05 82.05,74.975 r180 bottom locked
C250 "GRM033R60J104KE19D" CAPC0603X33X15LL03T05 77.9,71.9 r180 bottom locked
C251 "GRM033R60J104KE19D" CAPC0603X33X15LL03T05 78.925,71.95 r180 bottom locked
C252 "GRM033R60J104KE19D" CAPC0603X33X15LL03T05 79.975,72.95 r180 bottom locked
C253 "GRM033R60J104KE19D" CAPC0603X33X15LL03T05 82.2,72.175 r90 bottom locked
C254 "GRM033R60J104KE19D" CAPC0603X33X15LL03T05 84.45,75.95 r180 bottom locked
C255 "GRM033R60J104KE19D" CAPC0603X33X15LL03T05 81.125,72.975 r180 bottom locked
C256 "GRM033R60J104KE19D" CAPC0603X33X15LL03T05 76.925,82.9 r180 bottom locked
C257 "GRM033R60J104KE19D" CAPC0603X33X15LL03T05 76,76.9 r180 bottom locked
C258 "GRM033R60J104KE19D" CAPC0603X33X15LL03T05 74.225,74.908 r0 bottom locked
C259 "GRM033R60J104KE19D" CAPC0603X33X15LL03T05 86.2,72.475 r90 bottom locked
C260 "GRM033R60J104KE19D" CAPC0603X33X15LL03T05 84.2,73.025 r90 bottom locked
C261 "GRM033R60J104KE19D" CAPC0603X33X15LL03T05 87.65,72.9 r180 bottom locked
C262 "GRM033R60J104KE19D" CAPC0603X33X15LL03T05 85.2,74.475 r270 bottom locked
C263 "GRM033R60J104KE19D" CAPC0603X33X15LL03T05 86.45,73.975 r180 bottom locked
C264 "GRM033R60J104KE19D" CAPC0603X33X15LL03T05 112.85,66.75 r90 bottom locked
C265 "GRM033R60J104KE19D" CAPC0603X33X15LL03T05 112.725,54.05 r90 bottom locked
C266 "GRM033R60J104KE19D" CAPC0603X33X15LL03T05 120.9,66.8 r90 bottom locked
C267 "GRM033R60J104KE19D" CAPC0603X33X15LL03T05 117.65,53.625 r270 bottom locked
C268 "GRM033R60J104KE19D" CAPC0603X33X15LL03T05 118.3,66.85 r90 bottom locked
C269 "GRM033R60J104KE19D" CAPC0603X33X15LL03T05 111.2,62.5 r0 bottom locked
C270 "GRM033R60J104KE19D" CAPC0603X33X15LL03T05 112.95,75.9 r270 bottom locked
C271 "GRM033R60J104KE19D" CAPC0603X33X15LL03T05 114.5,54.075 r90 bottom locked
C272 "GRM033R60J104KE19D" CAPC0603X33X15LL03T05 119.6,75.75 r270 bottom locked
C273 "GRM033R60J104KE19D" CAPC0603X33X15LL03T05 118.2,62.9 r0 bottom locked
C274 "GRM033R60J104KE19D" CAPC0603X33X15LL03T05 123.5,66.925 r90 bottom locked
C275 "GRM033R60J104KE19D" CAPC0603X33X15LL03T05 114.65,62.95 r180 bottom locked
C276 "GRM033R60J104KE19D" CAPC0603X33X15LL03T05 114.425,75.9 r270 bottom locked
C277 "GRM033R60J104KE19D" CAPC0603X33X15LL03T05 120.575,62.825 r180 bottom locked
C278 "GRM033R60J104KE19D" CAPC0603X33X15LL03T05 117.95,75.85 r270 bottom locked
C279 "GRM033R60J104KE19D" CAPC0603X33X15LL03T05 118.975,54.3 r180 bottom locked
C280 "GRM033R60J104KE19D" CAPC0603X33X15LL03T05 114.45,66.75 r90 bottom locked
C281 "GRM033R60J104KE19D" CAPC0603X33X15LL03T05 118.325,56.175 r180 bottom locked
C282 "GRM033R60J104KE19D" CAPC0603X33X15LL03T05 120.43,54.3 r0 bottom
C283 "C1005X7R1E104M" CAPC1005X55X10LL05 24.257,89.764 r180 bottom
C284 "C1005X7R1E104M" CAPC1005X55X10LL05 24.257,87.249 r180 bottom
C285 "C1005X7R1E104M" CAPC1005X55X10LL05 24.282,80.721 r180 bottom
C286 "C1005X7R1E104M" CAPC1005X55X10LL05 24.308,77.724 r180 bottom
C287 "C1005X7R1E104M" CAPC1005X55X10LL05 24.282,74.727 r180 bottom
C288 "C1005X7R1E104M" CAPC1005X55X10LL05 30.025,90.4 r270 bottom
C289 "C1005X7R1E104M" CAPC1005X55X10LL05 30.9,113 r270 bottom locked
C290 "C1005X7R1E104M" CAPC1005X55X10LL05 40.792,89.713 r0 bottom
C291 "C1005X7R1E104M" CAPC1005X55X10LL05 40.996,85.674 r0 bottom
C292 "C1005X7R1E104M" CAPC1005X55X10LL05 40.894,74.752 r0 bottom
C293 "C1005X7R1E104M" CAPC1005X55X10LL05 40.818,79.223 r0 bottom
C294 "C1005X7R1E104M" CAPC1005X55X10LL05 40.97,87.249 r0 bottom
C295 "C1005X7R1E104M" CAPC1005X55X10LL05 18.87,89.5 r270 bottom locked
C296 "C1005X7R1E104M" CAPC1005X55X10LL05 18.87,113 r270 bottom locked
C297 "GRM188R61A225KE34x" CAPC1608X90X35ML10T15 112.85,3.4 r0 bottom locked
C298 "C1005X7R1E104M" CAPC1005X55X10LL05 112.05,8.8 r270 bottom locked
C299 "C1005X7R1E104M" CAPC1005X55X10LL05 114.6,5.075 r90 bottom
C300 "C1005X7R1E104M" CAPC1005X55X10LL05 117.85,5.05 r90 bottom
C301 "C1005X7R1E104M" CAPC1005X55X10LL05 114.3,14.9 r270 top
C302 "C1005X7R1E104M" CAPC1005X55X10LL05 115.15,14.9 r270 top
C303 "C1005X7R1E104M" CAPC1005X55X10LL05 115.95,14.9 r270 top
C304 "C1005X7R1E104M" CAPC1005X55X10LL05 116.75,14.9 r270 top
C305 "C1005X7R1E104M" CAPC1005X55X10LL05 117.55,14.9 r270 top
C306 "C1005X7R1E104M" CAPC1005X55X10LL05 118.35,14.9 r270 top
C307 "C1005X7R1E104M" CAPC1005X55X10LL05 119.15,14.9 r270 top
C308 "GRM155R71H472KA01D" CAPC1005X55X25NL05T10 121.05,2.3 r0 bottom locked
C309 "C1005X7R1E104M" CAPC1005X55X10LL05 119.95,14.9 r270 top
C310 "GRM155R71H103KA88D" CAPC1005X55X25ML05T10 47.3,19 r90 bottom locked
C311 "GRM155R71H103KA88D" CAPC1005X55X25ML05T10 41.1,18.6 r180 bottom locked
C312 "GRM155R71H103KA88D" CAPC1005X55X25ML05T10 40.7,13.1 r270 bottom locked
C313 "C1005X7R1E104M" CAPC1005X55X10LL05 44.7,33.1 r270 top
C314 "GRM155R71H103KA88D" CAPC1005X55X25ML05T10 36.9,14.7 r180 bottom locked
C315 "C1005X7R1E104M" CAPC1005X55X10LL05 45.5,33.1 r270 top
C316 "C1005X7R1E104M" CAPC1005X55X10LL05 95.4,68.55 r270 bottom
C317 "C1005X7R1E104M" CAPC1005X55X10LL05 94.625,68.575 r270 bottom
C318 "GRM155R71H103KA88D" CAPC1005X55X25ML05T10 49.5,20.2 r0 top
C319 "C1005X7R1E104M" CAPC1005X55X10LL05 41.6,31.6 r180 bottom locked
C320 "C1005X7R1E104M" CAPC1005X55X10LL05 43.2,30.6 r90 bottom locked
C321 "C1005X7R1E104M" CAPC1005X55X10LL05 40.5,30.4 r90 bottom locked
C322 "C1005X7R1E104M" CAPC1005X55X10LL05 47.7,30.5 r0 bottom locked
C323 "C1005X7R1E104M" CAPC1005X55X10LL05 40.6,24.8 r180 bottom locked
C324 "C1005X7R1E104M" CAPC1005X55X10LL05 44.5,23.4 r270 bottom locked
C325 "C1005X7R1E104M" CAPC1005X55X10LL05 50.7,28.1 r180 top
C326 "C1005X7R1E104M" CAPC1005X55X10LL05 47.1,23.3 r270 bottom locked
C327 "CGB2A1X5R1E105K033BC" CAPC1005X33X10LL5 41.9,34.5 r270 top
C328 "GRM31CR61E226KE15L" CAPC3216X180X55ML20T25 37.775,34.5 r180 bottom locked
C329 "GRM188R61A225KE34x" CAPC1608X90X35ML10T15 36.7,34.3 r90 top
C330 "C2012X5R1C106K085AC" CAPC2013X100X20NL20 42.025,34.6 r180 bottom locked
C331 "C1005X7R1E104M" CAPC1005X55X10LL05 44.1,30.6 r90 bottom locked
C332 "C1005X7R1E104M" CAPC1005X55X10LL05 47.7,29.6 r0 bottom locked
C333 "C1005X7R1E104M" CAPC1005X55X10LL05 38.3,29.2 r0 top
C334 "C1005X7R1E104M" CAPC1005X55X10LL05 38.3,30.7 r0 top
C335 "C1005X7R1E104M" CAPC1005X55X10LL05 47.8,25.5 r0 bottom locked
C336 "GRM155R71H103KA88D" CAPC1005X55X25ML05T10 70.75,19 r90 bottom locked
C337 "GRM155R71H103KA88D" CAPC1005X55X25ML05T10 64.55,18.6 r180 bottom locked
C338 "GRM155R71H103KA88D" CAPC1005X55X25ML05T10 64.15,13.1 r270 bottom locked
C339 "C1005X7R1E104M" CAPC1005X55X10LL05 68.2,33.2 r270 top
C340 "GRM155R71H103KA88D" CAPC1005X55X25ML05T10 60.35,14.7 r180 bottom locked
C341 "C1005X7R1E104M" CAPC1005X55X10LL05 69,33.2 r270 top
C342 "C1005X7R1E104M" CAPC1005X55X10LL05 97.15,67.4 r270 bottom
C343 "C1005X7R1E104M" CAPC1005X55X10LL05 96.325,67.425 r270 bottom
C344 "GRM155R71H103KA88D" CAPC1005X55X25ML05T10 72.95,20.2 r0 top
C345 "C1005X7R1E104M" CAPC1005X55X10LL05 65.05,31.6 r180 bottom locked
C346 "C1005X7R1E104M" CAPC1005X55X10LL05 63.95,30.4 r90 bottom locked
C347 "C1005X7R1E104M" CAPC1005X55X10LL05 71.15,30.5 r0 bottom locked
C348 "C1005X7R1E104M" CAPC1005X55X10LL05 64.05,24.8 r180 bottom locked
C349 "C1005X7R1E104M" CAPC1005X55X10LL05 67.95,23.4 r270 bottom locked
C350 "C1005X7R1E104M" CAPC1005X55X10LL05 70.55,23.3 r270 bottom locked
C351 "C1005X7R1E104M" CAPC1005X55X10LL05 74.15,28.1 r180 top
C352 "C1005X7R1E104M" CAPC1005X55X10LL05 66.65,30.7 r90 bottom locked
C353 "CGB2A1X5R1E105K033BC" CAPC1005X33X10LL5 65.35,34.5 r270 top
C354 "GRM31CR61E226KE15L" CAPC3216X180X55ML20T25 61.225,34.5 r180 bottom locked
C355 "GRM188R61A225KE34x" CAPC1608X90X35ML10T15 60.15,34.3 r90 top
C356 "C2012X5R1C106K085AC" CAPC2013X100X20NL20 65.475,34.6 r180 bottom locked
C357 "C1005X7R1E104M" CAPC1005X55X10LL05 67.55,30.6 r90 bottom locked
C358 "C1005X7R1E104M" CAPC1005X55X10LL05 71.15,29.6 r0 bottom locked
C359 "C1005X7R1E104M" CAPC1005X55X10LL05 61.75,29.2 r0 top
C360 "C1005X7R1E104M" CAPC1005X55X10LL05 61.75,30.7 r0 top
C361 "C1005X7R1E104M" CAPC1005X55X10LL05 71.25,25.5 r0 bottom locked
C362 "GRM155R71H103KA88D" CAPC1005X55X25ML05T10 13.087,19.825 r0 bottom locked
C363 "GRM155R71H103KA88D" CAPC1005X55X25ML05T10 14.087,17.225 r0 bottom locked
C364 "GRM155R71H103KA88D" CAPC1005X55X25ML05T10 28.097,17.225 r180 bottom locked
C365 "GRM155R71H103KA88D" CAPC1005X55X25ML05T10 29.097,19.825 r180 bottom locked
C366 "GRM155R71H103KA88D" CAPC1005X55X25ML05T10 12.497,30.125 r0 top
C367 "GRM31CR61E226KE15L" CAPC3216X180X55ML20T25 13.697,35.825 r270 bottom locked
C368 "GRM188R61A225KE34x" CAPC1608X90X35ML10T15 15.837,29.7 r0 bottom locked
C369 "C1005X7R1E104M" CAPC1005X55X10LL05 18.7,29.65 r180 bottom locked
C370 "C2012X5R1C106K085AC" CAPC2013X100X20NL20 10.597,37.925 r0 bottom locked
C371 "GRM31CR61E226KE15L" CAPC3216X180X55ML20T25 14.397,24.425 r0 bottom locked
C372 "GRM188R61A225KE34x" CAPC1608X90X35ML10T15 22.897,27.425 r270 bottom locked
C373 "C1005X7R1E104M" CAPC1005X55X10LL05 20.297,27.825 r270 bottom locked
C374 "GRM31CR61E226KE15L" CAPC3216X180X55ML20T25 13.687,35.825 r270 top
C375 "GRM188R61A225KE34x" CAPC1608X90X35ML10T15 12.997,32.425 r180 top
C376 "C2012X5R1C106K085AC" CAPC2013X100X20NL20 30.8,23.95 r180 bottom locked
C377 "C2012X5R1C106K085AC" CAPC2013X100X20NL20 29.6,21.95 r180 bottom locked
C378 "GRM31CR61E226KE15L" CAPC3216X180X55ML20T25 28.6,25.95 r180 bottom locked
C379 "GRM188R61A225KE34x" CAPC1608X90X35ML10T15 17.897,24.925 r90 bottom locked
C380 "C1005X7R1E104M" CAPC1005X55X10LL05 24.097,27.125 r270 bottom locked
C381 "GRM31CR61E226KE15L" CAPC3216X180X55ML20T25 28.9,33.95 r180 bottom locked
C382 "GRM188R61A225KE34x" CAPC1608X90X35ML10T15 22.2,36.55 r270 bottom locked
C383 "C1005X7R1E104M" CAPC1005X55X10LL05 18.6,32.25 r180 bottom locked
C384 "CGB2A1X5R1E105K033BC" CAPC1005X33X10LL5 8.697,37.625 r270 top
C385 "GRM31CR61E226KE15L" CAPC3216X180X55ML20T25 28.1,29.95 r270 bottom locked
C386 "GRM188R61A225KE34x" CAPC1608X90X35ML10T15 19.1,31.15 r180 bottom locked
C387 "C1005X7R1E104M" CAPC1005X55X10LL05 19.3,35.95 r90 bottom locked
C388 "C1005X7R1E104M" CAPC1005X55X10LL05 65.3,41.2 r180 bottom locked
C389 "C1005X7R1E104M" CAPC1005X55X10LL05 65.3,42.1 r180 bottom locked
C390 "T520B337M2R5ATE045" KEMT-520-B-2_M 94.52,98.28 r0 bottom
C391 "GRM033R60J104KE19D" CAPC0603X33X15LL03T05 89.8,86.925 r0 bottom locked
C392 "GRM033R60J104KE19D" CAPC0603X33X15LL03T05 89.875,78.925 r0 bottom locked
C393 "GRM033R60J104KE19D" CAPC0603X33X15LL03T05 90.2,77.3 r270 bottom locked
C394 "GRM033R60J104KE19D" CAPC0603X33X15LL03T05 90.2,62.5 r90 bottom locked
C395 "GRM033R60J104KE19D" CAPC0603X33X15LL03T05 91.2,88.5 r90 bottom locked
C396 "GRM033R60J104KE19D" CAPC0603X33X15LL03T05 90.2,81.5 r270 bottom locked
C397 "GRM033R60J104KE19D" CAPC0603X33X15LL03T05 90.2,70.4 r90 bottom locked
C398 "GRM033R60J104KE19D" CAPC0603X33X15LL03T05 90.6,64.9 r180 bottom locked
C399 "GRM033R60J104KE19D" CAPC0603X33X15LL03T05 90.2,90.5 r90 bottom locked
C400 "GRM033R60J104KE19D" CAPC0603X33X15LL03T05 89.8,82.9 r0 bottom locked
C401 "GRM033R60J104KE19D" CAPC0603X33X15LL03T05 90.2,72.5 r90 bottom locked
C402 "GRM033R60J104KE19D" CAPC0603X33X15LL03T05 90.5,66.939 r180 bottom locked
C403 "GRM033R60J104KE19D" CAPC0603X33X15LL03T05 90.2,92.5 r90 bottom locked
C404 "GRM033R60J104KE19D" CAPC0603X33X15LL03T05 90.2,84.5 r90 bottom locked
C405 "GRM033R60J104KE19D" CAPC0603X33X15LL03T05 90.2,74.6 r90 bottom locked
C406 "GRM033R60J104KE19D" CAPC0603X33X15LL03T05 90.5,68.9 r180 bottom locked
C407 "GRM155R60J475ME87D" CAPC1005X55X25LL05T10 91.7,94 r180 bottom locked
C408 "GRM155R60J475ME87D" CAPC1005X55X25LL05T10 92.3,85.5 r270 bottom locked
C409 "GRM155R60J475ME87D" CAPC1005X55X25LL05T10 91.2,76.5 r90 bottom locked
C410 "GRM155R60J475ME87D" CAPC1005X55X25LL05T10 90.6,68 r180 bottom locked
C411 "GRM155R60J475ME87D" CAPC1005X55X25LL05T10 91.8,87 r180 bottom locked
C412 "GRM155R60J475ME87D" CAPC1005X55X25LL05T10 91.2,83.5 r270 bottom locked
C413 "GRM155R60J475ME87D" CAPC1005X55X25LL05T10 91.7,74.9 r180 bottom locked
C414 "GRM155R60J475ME87D" CAPC1005X55X25LL05T10 92.7,63.9 r180 bottom locked
C415 "GRM155R60J475ME87D" CAPC1005X55X25LL05T10 91.8,90.9 r180 bottom locked
C416 "GRM155R60J475ME87D" CAPC1005X55X25LL05T10 91.8,81.8 r180 bottom locked
C417 "GRM155R60J475ME87D" CAPC1005X55X25LL05T10 91.4,73.4 r270 bottom locked
C418 "GRM155R60J475ME87D" CAPC1005X55X25LL05T10 90.7,64 r180 bottom locked
C419 "GRM155R60J475ME87D" CAPC1005X55X25LL05T10 91.75,93 r180 bottom locked
C420 "GRM155R60J475ME87D" CAPC1005X55X25LL05T10 92.3,79.4 r270 bottom locked
C421 "GRM155R60J475ME87D" CAPC1005X55X25LL05T10 89.1,70.5 r90 bottom locked
C422 "GRM155R60J475ME87D" CAPC1005X55X25LL05T10 91.7,62.699 r180 bottom locked
C423 "GRM31CR60J107ME39L" CAPC3216X190X55ML30T25 122.025,106.25 r270 bottom locked
C424 "GRM033R60J104KE19D" CAPC0603X33X15LL03T05 83.15,73.95 r180 bottom
C425 "GRM033R60J104KE19D" CAPC0603X33X15LL03T05 89.2,68.5 r90 bottom locked
C426 "GRM033R60J104KE19D" CAPC0603X33X15LL03T05 75.95,74.875 r180 bottom locked
C427 "GRM033R60J104KE19D" CAPC0603X33X15LL03T05 78,79.95 r180 bottom locked
C428 "GRM033R60J104KE19D" CAPC0603X33X15LL03T05 75.95,73.85 r180 bottom locked
C429 "GRM033R60J104KE19D" CAPC0603X33X15LL03T05 78.95,73.975 r180 bottom locked
C430 "GRM033R60J104KE19D" CAPC0603X33X15LL03T05 77.925,73.95 r180 bottom locked
C431 "GRM033R60J104KE19D" CAPC0603X33X15LL03T05 89.22,88.49 r90 bottom locked
C432 "GRM033R60J104KE19D" CAPC0603X33X15LL03T05 88.8,84.9 r0 bottom locked
C433 "GRM033R60J104KE19D" CAPC0603X33X15LL03T05 89.225,76.45 r90 bottom locked
C434 "GRM033R60J104KE19D" CAPC0603X33X15LL03T05 79.95,71.95 r180 bottom locked
C435 "GRM033R60J104KE19D" CAPC0603X33X15LL03T05 83.2,80.175 r270 bottom locked
C436 "GRM033R60J104KE19D" CAPC0603X33X15LL03T05 84.2,80.15 r270 bottom locked
C437 "GRM033R60J104KE19D" CAPC0603X33X15LL03T05 81.125,73.975 r180 bottom locked
C438 "GRM033R60J104KE19D" CAPC0603X33X15LL03T05 79.075,79.9 r180 bottom locked
C439 "GRM033R60J104KE19D" CAPC0603X33X15LL03T05 82.05,80.925 r180 bottom locked
C440 "GRM033R60J104KE19D" CAPC0603X33X15LL03T05 76.975,79.95 r180 bottom locked
C441 "GRM033R60J104KE19D" CAPC0603X33X15LL03T05 81,77.95 r180 bottom locked
C442 "GRM033R60J104KE19D" CAPC0603X33X15LL03T05 88.7,92.9 r0 bottom locked
C443 "GRM033R60J104KE19D" CAPC0603X33X15LL03T05 89.225,80.5 r90 bottom locked
C444 "GRM033R60J104KE19D" CAPC0603X33X15LL03T05 88.7,64.9 r0 bottom locked
C445 "GRM033R60J104KE19D" CAPC0603X33X15LL03T05 68.2,80.775 r270 bottom locked
C446 "GRM033R60J104KE19D" CAPC0603X33X15LL03T05 66.225,81.97 r90 bottom locked
C447 "GRM033R60J104KE19D" CAPC0603X33X15LL03T05 78.7,62.9 r0 bottom locked
C448 "GRM033R60J104KE19D" CAPC0603X33X15LL03T05 83.2,65.5 r90 bottom locked
C449 "GRM033R60J104KE19D" CAPC0603X33X15LL03T05 81.125,87.425 r270 bottom locked
C450 "GRM033R60J104KE19D" CAPC0603X33X15LL03T05 67.15,78.925 r90 bottom locked
C451 "GRM033R60J104KE19D" CAPC0603X33X15LL03T05 80.7,66.9 r0 bottom locked
C452 "GRM033R60J104KE19D" CAPC0603X33X15LL03T05 84.2,62.5 r90 bottom locked
C453 "GRM033R60J104KE19D" CAPC0603X33X15LL03T05 82.175,89.4 r270 bottom locked
C454 "GRM033R60J104KE19D" CAPC0603X33X15LL03T05 79.95,70.95 r180 bottom locked
C455 "GRM033R60J104KE19D" CAPC0603X33X15LL03T05 80.2,64.525 r90 bottom locked
C456 "GRM033R60J104KE19D" CAPC0603X33X15LL03T05 83.2,60.5 r90 bottom locked
C457 "GRM033R60J104KE19D" CAPC0603X33X15LL03T05 84.225,88.425 r270 bottom locked
C458 "GRM033R60J104KE19D" CAPC0603X33X15LL03T05 79.95,77.925 r180 bottom locked
C459 "GRM033R60J104KE19D" CAPC0603X33X15LL03T05 79.175,78.15 r90 bottom locked
C460 "GRM033R60J104KE19D" CAPC0603X33X15LL03T05 73.175,65.525 r90 bottom locked
C461 "GRM033R60J104KE19D" CAPC0603X33X15LL03T05 75.225,64.5 r90 bottom locked
C462 "GRM033R60J104KE19D" CAPC0603X33X15LL03T05 75.7,66.6 r90 bottom locked
C463 "GRM033R60J104KE19D" CAPC0603X33X15LL03T05 80.225,84.35 r270 bottom locked
C464 "GRM033R60J104KE19D" CAPC0603X33X15LL03T05 78.175,85.4 r270 bottom locked
C465 "GRM033R60J104KE19D" CAPC0603X33X15LL03T05 87.2,63.6 r90 bottom locked
C466 "GRM033R60J104KE19D" CAPC0603X33X15LL03T05 86.2,67.2 r270 bottom locked
C467 "GRM033R60J104KE19D" CAPC0603X33X15LL03T05 85.6,61.9 r0 bottom locked
C468 "GRM033R60J104KE19D" CAPC0603X33X15LL03T05 87.175,88.5 r90 bottom locked
C469 "GRM033R60J104KE19D" CAPC0603X33X15LL03T05 86.225,91.5 r90 bottom locked
C470 "GRM033R60J104KE19D" CAPC0603X33X15LL03T05 86.175,86.425 r270 bottom locked
C471 "GRM033R60J104KE19D" CAPC0603X33X15LL03T05 67.225,68.475 r90 bottom locked
C472 "GRM033R60J104KE19D" CAPC0603X33X15LL03T05 67.225,73.5 r270 bottom locked
C473 "GRM033R60J104KE19D" CAPC0603X33X15LL03T05 71.2,66.425 r90 bottom locked
C474 "GRM033R60J104KE19D" CAPC0603X33X15LL03T05 68.15,66.475 r270 bottom locked
C475 "GRM033R60J104KE19D" CAPC0603X33X15LL03T05 66.219,77.45 r270 bottom locked
C476 "GRM033R60J104KE19D" CAPC0603X33X15LL03T05 68.253,76.35 r270 bottom locked
C477 "GRM033R60J104KE19D" CAPC0603X33X15LL03T05 68.425,72.925 r0 bottom locked
C478 "GRM033R60J104KE19D" CAPC0603X33X15LL03T05 70.15,69.475 r90 bottom locked
C479 "GRM033R60J104KE19D" CAPC0603X33X15LL03T05 70.2,64.5 r90 bottom locked
C480 "GRM033R60J104KE19D" CAPC0603X33X15LL03T05 78.175,84.25 r270 bottom locked
C481 "C1005X7R1E104M" CAPC1005X55X10LL05 19.583,124.46 r270 top
C482 "C1005X7R1E104M" CAPC1005X55X10LL05 19.583,147.828 r90 top
C483 "C1005X7R1E104M" CAPC1005X55X10LL05 101.4,152.5 r270 bottom locked
C484 "GRM155R61A224KE19D" CAPC1005X55X25NL05T10 96.2,143.3 r90 top
C485 "GRM155R61A224KE19D" CAPC1005X55X25NL05T10 95.2,143.3 r90 top
C486 "GRM155R61A224KE19D" CAPC1005X55X25NL05T10 91.9,143.3 r90 top
C487 "GRM155R61A224KE19D" CAPC1005X55X25NL05T10 90.9,143.3 r90 top
C488 "GRM155R61A224KE19D" CAPC1005X55X25NL05T10 87.9,143.4 r90 top
C489 "GRM155R61A224KE19D" CAPC1005X55X25NL05T10 86.9,143.4 r90 top
C490 "GRM155R61A224KE19D" CAPC1005X55X25NL05T10 83.9,143.4 r90 top